# Altium PCB ResearchProject_V4_final.PcbDoc (part 2 of 2)
Units mm, origin at the board's own origin, x right, y up, seen from the top; angles counter-clockwise.
Board outline 152.49 x 130.17 mm, 4 copper layers (Top Layer, GND, 3V3, Bottom Layer), stack 0.603 mm thick; 141 components, 186 nets, 748 pads, 203 vias.
Unrouted connection lines stored in the file: 6.
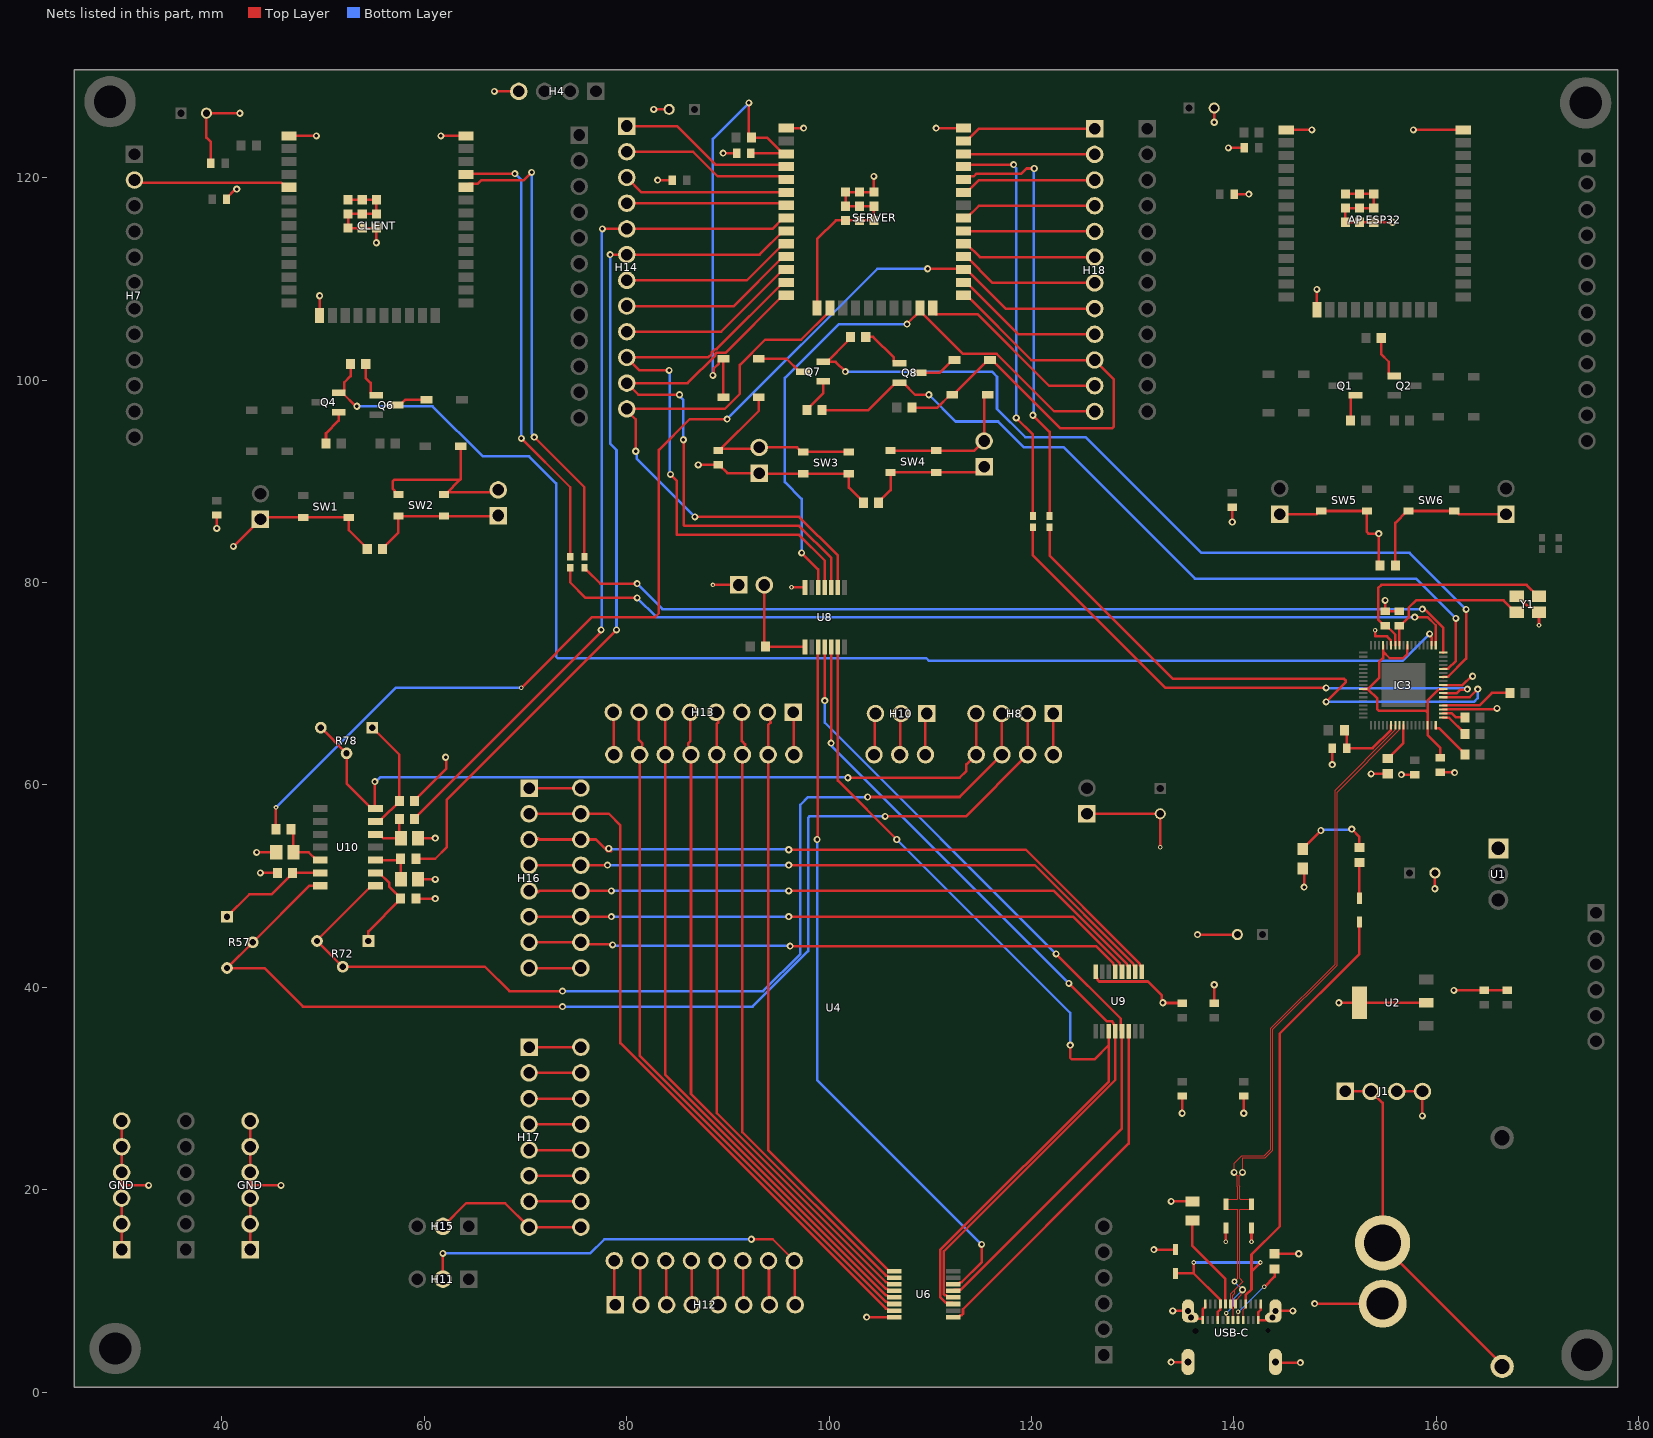
[diagram p4: the nets of this part, all layers, seen from the top]

## Via types
v1: diameter 0.7, hole 0.35, Top Layer to Bottom Layer, 188 vias
v2: diameter 0.45, hole 0.225, Top Layer to Bottom Layer, 14 vias
v3: diameter 0.6, hole 0.3, Top Layer to Bottom Layer, 1 vias

## Nets (pads, with @x,y where several pads share a name; then routed paths per layer and width w, separated by ;. In a path a pad name is that pad's centre, name@x,y a point inside that pad or via, vN(x,y) a via of type N, cw(c..) or ccw(c..) an arc to the next point about the centre after c; other vN are vias at no path point) (continued)
CLIENT_GPIO39: CLIENT.5 H7.2 | length 15.5
  Top Layer w0.25: H7.2@31.369,119.761 31.637,119.493 45.881,119.493 46.322,119.052 CLIENT.5@46.622,119.052
CLIENT_IO0_AUTO: D17.1 Q6.3 | length 3.2
  Top Layer w0.25: Q6.3@57.261,97.536 57.611,97.536 58.119,98.044 D17.1@60.226,98.044
CLIENT_IO0_KEY: D16.1 H20.2 SW2.3 SW2.4 | length 19.5
  Top Layer w0.25: SW2.4@57.44,88.705 57.29,88.705 57.065,88.93 57.065,89.08 56.896,89.249 56.896,90.024 57.042,90.17 63.555,90.17 63.599,90.214 ; D16.1@63.599,93.472 63.599,90.214 ; H20.2@67.31,89.154 67.085,88.929 62.165,88.929 SW2.3@61.94,88.705 62.09,88.705 63.599,90.214
CLIENT_RTS: IC3.19 Q4.2 R51.1 | length 134.3
  Top Layer w0.25: Q4.2@51.546,98.75 Q4.2@51.896,98.75 ; R51.1@52.717,101.6 52.717,100.398 52.096,99.777 52.096,98.95 Q4.2@51.896,98.75 ; v1(53.34,97.409) 53.237,97.409 Q4.2@51.896,98.75 ; v1(159.335,74.93) 159.335,74.808 159.537,74.606 IC3.19@159.537,73.813
  Bottom Layer w0.25: v1(53.34,97.409) 60.833,97.409 65.786,92.456 70.358,92.456 73.025,89.789 73.025,72.663 73.171,72.517 109.613,72.517 109.867,72.263 156.668,72.263 v1(159.335,74.93)
CLIENT_RXD: IC3.18 R19.1 | length 90.7
  Top Layer w0.25: R19.1@74.422,81.45 74.422,80.01 75.946,78.486 v1(81.026,78.486) ; v1(157.861,76.581) 159.131,76.581 159.937,75.775 IC3.18@159.937,73.813
  Bottom Layer w0.25: v1(81.026,78.486) 82.931,76.581 v1(157.861,76.581)
CLIENT_TXD: IC3.17 R18.1 | length 89.8
  Top Layer w0.25: R18.1@75.819,81.45 75.819,81.375 75.994,81.2 76.069,81.2 77.386,79.883 v1(81.026,79.883) ; v1(158.623,77.376) 158.709,77.29 158.919,77.29 160.687,75.522 IC3.17@160.687,73.063
  Bottom Layer w0.25: v1(81.026,79.883) 83.533,77.376 v1(158.623,77.376)
CLIENT_U0RXD: CLIENT.34 R18.2 | length 47.2
  Top Layer w0.25: CLIENT.34@64.122,119.052 64.447,119.377 65.275,119.377 65.659,119.761 69.85,119.761 v1(70.612,120.523) ; v1(70.866,94.361) 75.819,89.408 R18.2@75.819,82.55
  Bottom Layer w0.25: v1(70.612,120.523) 70.612,94.737 70.866,94.483 v1(70.866,94.361)
CLIENT_U0TXD: CLIENT.35 R19.2 | length 45
  Top Layer w0.25: CLIENT.35@64.122,120.322 64.196,120.396 v1(68.961,120.396) ; v1(69.596,94.234) 74.422,89.408 R19.2@74.422,82.55
  Bottom Layer w0.25: v1(68.961,120.396) 69.596,119.761 v1(69.596,94.234)
GND: "AP ESP32.1" "AP ESP32.15" "AP ESP32.38" "AP ESP32.39" "AP ESP32.40" "AP ESP32.41" "AP ESP32.42" "AP ESP32.43" "AP ESP32.44" "AP ESP32.45" "AP ESP32.46" "AP ESP32.47" C1.2 C2.2 C3.2 C4.2 C5.2 C6.2 C7.2 C8.2 C9.2 C10.2 C11.2 C12.1 C16.2 C17.2 C25.2 C32.2 C35.1 C37.2 C38.2 C39.2 C43.2 C45.1 C46.2 C49.2 C50.2 C51.2 C52.2 C59.2 C60.2 CLIENT.1 CLIENT.15 CLIENT.38 CLIENT.39 CLIENT.40 CLIENT.41 CLIENT.42 CLIENT.43 CLIENT.44 CLIENT.45 CLIENT.46 CLIENT.47 D8.1 D9.1 D10.1 D13.1 GND.1 GND.2 GND.3 GND.4 GND.5 GND.6 H4.4 H6.1 H19.1 H21.1 H22.1 IC3.3 IC3.9 IC3.29 J1.3 J1.4 J2.2 R5.2 R38.2 R50.2 R56.1 R65.2 R70.1 R77.1 R81.2 R88.2 SERVER.1 SERVER.15 SERVER.38 SERVER.39 SERVER.40 SERVER.41 SERVER.42 SERVER.43 SERVER.44 SERVER.45 SERVER.46 SERVER.47 SW1.1 SW1.2 SW3.1 SW3.2 SW5.1 SW5.2 U1.1 U2.2 U2.4 U4.1 U6.8 U8.7 U9.8 USB-C.1 USB-C.2 USB-C.3 USB-C.4 USB-C.A1 USB-C.A12 USB-C.B1 USB-C.B12 Y1.2 Y1.4 | length 303.4
  Top Layer w0.25: GND.1@30.099,14.097 GND.2@30.099,16.637 GND.3@30.099,19.177 30.099,20.435 ; GND.4@30.099,21.705 30.099,20.435 ; GND.4@30.099,21.717 GND.5@30.099,24.257 GND.6@30.099,26.797 ; v1(32.766,20.435) 30.099,20.435 ; C16.2@38.914,121.412 38.914,123.528 38.481,123.961 C8.2@38.481,126.365 v1(41.783,126.365) ; v1(39.497,85.344) C35.1@39.497,86.666 ; C9.2@40.461,117.856 40.461,117.961 41.372,118.872 v1(41.477,118.872) ; v1(41.148,83.566) H19.1@43.815,86.233 44.01,86.428 SW1.2@48.042,86.428 SW1.1@52.542,86.428 52.542,85.188 54.368,83.362 R50.2@54.368,83.312 ; GND.1@42.799,14.097 GND.2@42.799,16.637 GND.3@42.799,19.177 42.799,20.435 ; GND.4@42.799,21.705 42.799,20.435 ; GND.4@42.799,21.717 GND.5@42.799,24.257 GND.6@42.799,26.797 ; v1(43.434,53.34) C43.2@45.378,53.34 ; v1(43.815,51.308) R56.1@45.49,51.308 ; v1(45.847,20.435) 42.799,20.435 ; CLIENT.1@46.622,124.132 v1(49.35,124.132) ; CLIENT.15@49.657,106.372 v1(49.657,108.331) ; CLIENT.39@52.472,117.812 CLIENT.46@53.872,117.812 CLIENT.45@55.272,117.812 CLIENT.44@55.272,116.412 CLIENT.47@53.872,116.412 CLIENT.40@52.472,116.412 CLIENT.41@52.472,115.012 CLIENT.42@53.872,115.012 CLIENT.43@55.272,115.012 v1(55.272,113.565) ; R77.1@59.043,58.42 59.043,58.47 62.168,61.595 62.168,62.673 v1(62.103,62.738) ; R70.1@59.17,48.768 v1(61.087,48.768) ; C46.2@59.397,50.673 v1(61.087,50.673) ; C49.2@59.397,54.737 v1(61.087,54.737) ; v1(61.648,124.132) CLIENT.38@64.122,124.132 ; v1(66.929,128.524) H4.4@69.342,128.524 ; v1(82.677,126.746) C50.2@84.201,126.746 ; v1(83.058,119.761) C51.2@84.507,119.761 ; v1(87.07,91.619) C45.1@89.027,91.619 ; v2(88.519,79.756) H21.1@91.059,79.756 ; C45.1@89.132,91.619 89.946,90.805 H22.1@93.091,90.805 93.15,90.746 SW3.2@97.445,90.746 SW3.1@101.945,90.746 101.945,89.379 103.39,87.934 R65.2@103.39,87.884 ; v1(89.535,122.428) C52.2@90.857,122.428 ; SERVER.1@95.771,124.894 v1(97.483,124.894) ; v2(96.283,79.519) U8.7@97.618,79.519 ; SERVER.15@98.806,107.134 98.806,113.919 100.661,115.774 SERVER.41@101.621,115.774 SERVER.42@103.021,115.774 SERVER.43@104.421,115.774 SERVER.44@104.421,117.174 SERVER.47@103.021,117.174 SERVER.40@101.621,117.174 SERVER.39@101.621,118.574 SERVER.46@103.021,118.574 SERVER.45@104.421,118.574 v1(104.421,120.115) ; v1(103.707,7.418) U6.8@106.426,7.418 ; v1(110.564,124.894) SERVER.38@113.271,124.894 ; U4.1@125.476,57.149 C17.2@132.715,57.15 v2(132.715,53.848) ; U9.8@126.335,41.529 126.335,41.029 126.533,40.831 126.533,40.71 126.666,40.577 131.508,40.577 132.883,39.202 132.883,38.567 v1(132.969,38.481) 132.995,38.455 134.848,38.455 C32.2@134.874,38.429 ; v1(132.08,14.097) D10.1@134.239,14.097 ; v1(133.792,18.857) R88.2@135.89,18.857 ; v1(133.798,2.981) USB-C.3@135.463,2.981 ; v1(133.955,8.031) USB-C.1@135.463,8.031 ; v1(134.874,27.559) C7.2@134.874,29.262 ; USB-C.1@135.763,7.381 135.888,7.256 136.898,7.256 136.908,7.246 USB-C.B12@136.908,7.131 136.908,8.166 137.158,8.416 USB-C.A1@137.158,8.731 ; v1(136.398,45.212) C3.2@140.335,45.212 ; C37.2@138.049,38.429 v1(138.049,40.259) ; v1(138.049,125.476) C1.2@138.049,126.873 ; v2(139.192,14.859) D9.1@139.192,16.224 ; v1(139.446,122.936) C10.2@141.022,122.936 ; v1(139.827,85.979) C12.1@139.827,87.428 ; C11.2@140.029,118.364 v1(141.478,118.364) ; v1(140.97,27.559) C5.2@140.97,29.262 ; v2(141.732,14.859) D8.1@141.732,16.224 ; USB-C.A12@142.658,8.731 142.648,8.721 142.648,8.146 142.408,7.906 USB-C.B1@142.408,7.131 143.496,7.131 144.103,7.738 USB-C.2@144.103,8.031 v1(145.826,8.031) ; R81.2@144.018,13.685 v1(146.4,13.685) ; USB-C.4@144.103,2.981 144.163,2.921 v1(146.558,2.921) ; H6.1@144.526,86.741 148.154,86.741 148.476,87.063 SW5.2@148.626,87.063 SW5.1@153.126,87.063 153.126,84.999 153.289,84.836 v1(154.305,84.836) 154.305,81.8 R5.2@154.444,81.661 ; 145.161,124.714 v1(147.701,124.714) ; D13.1@146.812,51.755 146.939,51.628 v1(146.939,49.911) ; v1(147.968,8.75) J2.2@154.686,8.75 ; 148.196,106.954 v1(148.196,108.953) ; v1(149.71,61.999) C25.2@149.71,63.627 ; v1(150.368,38.481) U2.4@152.402,38.481 U2.2@159.002,38.481 ; 151.011,118.394 152.411,118.394 153.811,118.394 153.811,116.994 152.411,116.994 151.011,116.994 151.011,115.594 152.411,115.594 153.811,115.594 v1(155.678,115.594) ; v1(153.555,61.099) R38.2@155.194,61.099 ; v2(153.943,75.292) 153.943,74.676 155.119,74.676 155.512,74.283 155.512,73.838 IC3.29@155.537,73.813 ; v1@154.854,78.146 v1(154.94,78.232) C60.2@154.94,77.164 C59.2@156.337,77.164 ; J1.3@156.083,29.718 J1.4@158.623,29.718 v1(158.623,27.305) ; v1(156.539,61.012) C39.2@157.861,61.012 ; v1(157.734,124.714) 162.661,124.714 ; v1(159.853,49.744) C2.2@159.853,51.308 ; C38.2@160.401,61.266 160.427,61.24 161.772,61.24 v1(161.798,61.214) ; IC3.3@160.687,67.463 160.712,67.488 165.913,67.488 v1(165.989,67.564) ; IC3.9@160.687,69.863 162.573,69.863 163.449,70.739 v1(163.576,70.739) ; v1(161.723,39.699) C4.2@164.719,39.699 C6.2@167.005,39.699 ; Y1.4@167.937,78.651 168.062,78.651 169.212,77.501 169.687,77.501 Y1.2@170.137,77.051 v2(170.137,75.776)
NetC25_1: C25.1 FB2.2 IC3.57 | length 7.5
  Top Layer w0.25: FB2.2@150.914,65.405 151.13,65.189 C25.1@151.13,63.627 153.696,63.627 155.512,65.443 155.512,65.888 IC3.57@155.537,65.913
NetC43_1: C43.1 R54.2 U10.5 | length 5.3
  Top Layer w0.25: R54.2@46.851,55.626 47.078,55.399 C43.1@47.078,53.34 48.589,53.34 49.351,52.578 U10.5@49.732,52.578
NetC46_1: C46.1 R68.2 U10.10 | length 4.6
  Top Layer w0.25: U10.10@55.17,52.578 57.543,52.578 R68.2@57.67,52.705 57.697,52.678 C46.1@57.697,50.673
NetC49_1: C49.1 R75.2 U10.12 | length 4.7
  Top Layer w0.25: U10.12@55.17,55.118 55.551,55.118 55.932,54.737 C49.1@57.697,54.737 57.543,54.891 R75.2@57.543,56.642
NetC59_1: C59.1 IC3.27 Y1.1 | length 15.6
  Top Layer w0.25: IC3.27@156.337,73.813 C59.1@156.337,75.744 156.442,75.744 157.259,76.561 157.259,77.503 157.988,78.232 166.631,78.232 167.812,77.051 Y1.1@167.937,77.051
NetC60_1: C60.1 IC3.28 Y1.3 | length 22.8
  Top Layer w0.25: C60.1@154.94,75.744 154.835,75.744 154.243,76.336 154.243,79.44 154.559,79.756 168.907,79.756 170.012,78.651 Y1.3@170.137,78.651 ; C60.1@155.045,75.744 155.937,74.852 IC3.28@155.937,73.813
NetCN1_A4: D6.2 D10.2 USB-C.A4 USB-C.A9 USB-C.B4 USB-C.B9 | length 60.6
  Top Layer w0.1: USB-C.B4@140.908,7.131 140.908,8.166 141.158,8.416 USB-C.A9@141.158,8.731
  Top Layer w0.25: D10.2@134.239,11.747 136.028,11.747 ; v2(136.028,12.816) 136.028,11.747 ; USB-C.B9@138.408,7.131 138.408,7.951 138.648,8.191 138.648,8.721 USB-C.A4@138.658,8.731 138.648,8.741 138.648,9.127 136.028,11.747 ; USB-C.A9@141.158,8.731 141.158,9.591 141.732,10.165 141.732,11.877 ; v2(142.61,12.816) 141.732,11.938 141.732,11.877 ; D6.2@152.4,46.45 152.4,43.307 144.526,35.433 144.526,16.383 141.732,13.589 141.732,11.877
  Bottom Layer w0.25: v2(136.028,12.816) v2(142.61,12.816)
NetCN1_A5: R88.1 USB-C.A5 | length 9.6
  Top Layer w0.25: R88.1@135.89,16.957 135.89,14.448 139.158,11.18 USB-C.A5@139.158,8.731
NetCN1_B5: R81.1 USB-C.B5 | length 6.6
  Top Layer w0.1: USB-C.B5@140.408,7.131 v2(140.408,7.947)
  Top Layer w0.25: v2(143.002,10.414) 144.018,11.43 R81.1@144.018,12.184
  Bottom Layer w0.1: v2(140.408,7.947) 140.472,7.947 142.939,10.414 v2(143.002,10.414)
NetD13_2: D13.2 R44.1 | length 7.8
  Top Layer w0.25: D13.2@146.812,53.655 146.812,53.73 148.581,55.499 v1(148.59,55.499) ; v1(151.638,55.626) 152.4,54.864 R44.1@152.4,53.824
  Bottom Layer w0.25: v1(148.59,55.499) 148.653,55.562 151.575,55.562 v1(151.638,55.626)
NetF1_1: F1.1 J1.1 J1.2 J2.1 | length 35.1
  Top Layer w0.25: J1.1@151.003,29.718 J1.2@153.543,29.718 154.686,28.575 J2.1@154.686,14.75 154.686,14.554 166.497,2.743 F1.1@166.497,2.546
NetH20_1: H20.1 R50.1 SW2.1 SW2.2 | length 13.8
  Top Layer w0.25: R50.1@55.868,83.312 55.868,83.362 57.44,84.934 SW2.2@57.44,86.555 SW2.1@61.94,86.555 67.251,86.555 H20.1@67.31,86.614
NetH21_2: H21.2 R48.1 U8.8 | length 10.1
  Top Layer w0.25: H21.2@93.599,79.756 93.599,73.775 R48.1@93.714,73.66 97.601,73.66 U8.8@97.618,73.643
NetH23_1: H23.1 R65.1 SW4.1 SW4.2 | length 13
  Top Layer w0.25: R65.1@104.89,87.884 104.89,87.934 106.081,89.125 SW4.2@106.081,90.873 SW4.1@110.581,90.873 114.749,90.873 H23.1@115.316,91.44
NetH24_1: H24.1 R5.1 SW6.1 SW6.2 | length 15.8
  Top Layer w0.25: R5.1@155.944,81.661 155.944,85.895 157.112,87.063 SW6.2@157.262,87.063 SW6.1@161.762,87.063 161.912,87.063 162.234,86.741 H24.1@166.878,86.741
NetIC3_1: IC3.1 R42.2 | length 2.8
  Top Layer w0.25: IC3.1@160.687,66.663 160.712,66.638 161.262,66.638 162.826,65.074 R42.2@162.826,65.024
NetIC3_2: IC3.2 R40.2 | length 2.3
  Top Layer w0.25: IC3.2@160.687,67.063 161.537,67.063 161.925,66.675 R40.2@162.826,66.675
NetIC3_4: IC3.4 R33.1 | length 7.1
  Top Layer w0.25: IC3.4@160.687,67.863 164.256,67.863 165.481,69.088 R33.1@167.271,69.088
NetIC3_60: IC3.60 R38.1 | length 4
  Top Layer w0.25: R38.1@155.194,62.599 155.244,62.599 155.569,62.924 155.569,62.974 156.737,64.142 IC3.60@156.737,65.913
NetIC3_68: IC3.68 R45.1 | length 4.3
  Top Layer w0.25: IC3.68@159.937,65.913 159.937,65.638 159.962,65.613 160.255,65.613 162.826,63.042 R45.1@162.826,62.992
NetQ1_1: Q1.1 R2.2 | length 2.8
  Top Layer w0.25: R2.2@151.523,96.012 151.523,98.281 151.723,98.481 Q1.1@152.003,98.481
NetQ2_1: Q2.1 R3.2 | length 4.5
  Top Layer w0.25: R3.2@154.547,104.14 154.547,102.557 155.295,101.809 155.295,100.601 155.495,100.401 Q2.1@155.845,100.401
NetQ4_1: Q4.1 R47.2 | length 3.6
  Top Layer w0.25: R47.2@50.304,93.726 50.292,93.738 50.292,94.742 51.546,95.996 Q4.1@51.546,96.83
NetQ6_1: Q6.1 R51.2 | length 3.7
  Top Layer w0.25: R51.2@54.217,101.6 54.217,100.208 54.711,99.714 54.711,98.696 54.911,98.496 Q6.1@55.261,98.496
NetQ7_1: Q7.1 R59.2 | length 3.5
  Top Layer w0.25: R59.2@97.802,97.028 97.802,97.078 99.425,98.701 Q7.1@99.425,99.878
NetQ8_1: Q8.1 R69.2 | length 4.6
  Top Layer w0.25: R69.2@103.62,104.267 104.354,104.267 106.4,102.221 106.4,101.871 106.6,101.671 Q8.1@106.95,101.671
NetR56_2: R56.2 R57.1 U10.6 | length 11
  Top Layer w0.25: R57.1@40.513,46.99 42.711,49.188 44.92,49.188 46.99,51.258 R56.2@46.99,51.308 U10.6@49.732,51.308
NetR70_2: R70.2 R72.1 U10.9 | length 9.3
  Top Layer w0.25: R72.1@54.483,44.577 54.483,45.531 57.67,48.718 57.67,48.818 56.561,49.927 56.561,50.298 55.551,51.308 U10.9@55.17,51.308
NetR77_2: R77.2 R78.1 U10.13 | length 11.6
  Top Layer w0.25: R78.1@54.864,65.659 57.543,62.98 57.543,58.37 55.786,56.613 55.395,56.613 U10.13@55.17,56.388
NetU6_9: U6.9 U9.14 | length 35.8
  Top Layer w0.25: U6.9@112.276,7.418 112.776,7.418 112.974,7.616 113.095,7.616 113.228,7.749 113.228,8.199 129.585,24.556 U9.14@129.585,35.679
PLC_A_1: H8.2 R57.2 R57.3 U4.4 U10.7 | length 115.4
  Top Layer w0.25: U10.7@49.732,50.038 49.717,50.023 48.626,50.023 R57.2@43.053,44.45 R57.3@40.513,41.91 44.196,41.91 48.006,38.1 v1(73.66,38.1) ; v1(105.537,56.896) 113.523,56.896 U4.4@119.616,62.989 119.603,63.002 119.603,67.042 H8.2@119.59,67.055
  Bottom Layer w0.25: v1(73.66,38.1) 92.445,38.1 97.917,43.572 97.917,56.75 98.063,56.896 v1(105.537,56.896)
PLC_A_2: H8.3 R72.2 R72.3 U4.5 U10.8 | length 100.2
  Top Layer w0.25: U10.8@55.17,50.038 54.789,50.038 49.403,44.652 R72.3@49.403,44.577 R72.2@51.943,42.037 65.999,42.037 68.412,39.624 v1(73.66,39.624) ; v1(103.796,58.808) 112.894,58.808 U4.5@117.076,62.989 117.063,63.002 117.063,67.042 H8.3@117.05,67.055
  Bottom Layer w0.25: v1(73.66,39.624) 93.472,39.624 97.155,43.307 97.155,58.039 97.917,58.801 103.789,58.801 v1(103.796,58.808)
PLC_A_3: H8.4 R78.2 R78.3 U4.6 U10.14 | length 78.2
  Top Layer w0.25: R78.3@49.784,65.659 R78.2@52.324,63.119 52.324,60.123 54.789,57.658 U10.14@55.17,57.658 55.118,57.71 v1(55.118,60.325) ; v1(101.854,60.706) 112.884,60.706 113.569,61.391 113.569,62.022 U4.6@114.536,62.989 114.523,63.002 114.523,67.042 H8.4@114.51,67.055
  Bottom Layer w0.25: v1(55.118,60.325) 55.236,60.325 55.69,60.778 101.782,60.778 v1(101.854,60.706)
PLC_A_GND: H8.1 U4.3 | length 4.1
  Top Layer w0.25: H8.1@122.13,67.055 122.156,67.029 U4.3@122.156,62.989
PLC_A_RS_GND: H10.3 U4.9 | length 4.1
  Top Layer w0.25: U4.9@104.436,62.989 104.508,63.062 104.508,66.983 H10.3@104.581,67.055
PLC_A_RS_RX: H10.1 U4.7 | length 4.1
  Top Layer w0.25: U4.7@109.516,62.989 109.516,66.91 H10.1@109.661,67.055
PLC_A_RS_TX: H10.2 U4.8 | length 4.1
  Top Layer w0.25: U4.8@106.976,62.989 107.048,63.062 107.048,66.983 H10.2@107.121,67.055
PLC_B_1: H13.2 U4.11 U6.1 | length 60.9
  Top Layer w0.25: H13.2@93.913,67.182 94.195,66.9 94.195,66.206 94.234,66.167 93.976,65.909 U4.11@93.976,62.989 93.976,23.918 105.926,11.968 U6.1@106.426,11.968
PLC_B_2: H13.3 U4.12 U6.2 | length 61.7
  Top Layer w0.25: H13.3@91.373,67.182 91.373,64.329 91.694,64.008 91.694,63.881 ; U4.12@91.436,62.989 91.436,25.688 105.607,11.516 105.728,11.516 105.926,11.318 U6.2@106.426,11.318
PLC_B_3: H13.4 U4.13 U6.3 | length 64.3
  Top Layer w0.25: H13.4@88.833,67.182 89.027,66.988 89.027,66.167 88.896,66.036 U4.13@88.896,62.989 88.896,27.578 105.607,10.866 105.728,10.866 105.926,10.668 U6.3@106.426,10.668
PLC_B_4: H13.5 U4.14 U6.4 | length 65
  Top Layer w0.25: 86.106,63.881 86.106,64.135 86.293,64.322 H13.5@86.293,67.182 ; U4.14@86.356,62.989 86.356,29.468 105.607,10.216 105.728,10.216 105.926,10.018 U6.4@106.426,10.018
PLC_B_5: H13.6 U4.15 U6.5 | length 67.6
  Top Layer w0.25: H13.6@83.753,67.182 83.816,67.119 83.816,66.29 ; 83.82,66.294 83.816,66.29 ; U6.5@106.426,9.368 105.926,9.368 105.728,9.566 105.607,9.566 83.816,31.358 U4.15@83.816,62.989 83.816,66.29
PLC_B_6: H13.7 U4.16 U6.6 | length 68.5
  Top Layer w0.25: H13.7@81.213,67.182 81.213,64.456 81.557,64.112 81.557,63.904 81.534,63.881 ; U4.16@81.276,62.989 81.276,33.248 105.607,8.916 105.728,8.916 105.926,8.718 U6.6@106.426,8.718
PLC_B_GND: H13.1 U4.10 | length 4.2
  Top Layer w0.25: H13.1@96.453,67.182 96.516,67.119 U4.10@96.516,62.989
PLC_B_VI: H13.8 U4.17 | length 4.2
  Top Layer w0.25: H13.8@78.673,67.182 78.704,67.151 78.704,63.021 U4.17@78.736,62.989
PLC_C_1: H16.2 U4.19 U6.7 | length 69
  Top Layer w0.25: H16.2@70.358,57.149 71.501,57.15 U4.19@75.476,57.149 78.233,57.149 79.375,56.007 79.375,34.499 105.607,8.266 105.728,8.266 105.926,8.068 U6.7@106.426,8.068
PLC_C_2: H16.3 U4.20 U9.1 | length 65.8
  Top Layer w0.25: 71.247,54.737 71.375,54.609 U4.20@75.476,54.609 76.963,54.609 78.105,53.467 78.486,53.467 ; v1(96.012,53.594) 119.44,53.594 130.687,42.348 130.687,42.227 130.885,42.029 U9.1@130.885,41.529
  Bottom Layer w0.25: v1(78.232,53.721) 78.295,53.657 95.948,53.657 v1(96.012,53.594)
PLC_C_3: H16.4 U4.21 U9.2 | length 64.6
  Top Layer w0.25: H16.4@70.358,52.069 76.454,52.069 v1(78.105,52.07) ; v1(96.012,52.07) 120.314,52.07 130.037,42.348 130.037,42.227 130.235,42.029 U9.2@130.235,41.529
  Bottom Layer w0.25: v1(78.105,52.07) v1(96.012,52.07)
PLC_C_4: H16.5 U4.22 U9.3 | length 62.1
  Top Layer w0.25: 71.247,49.403 71.373,49.529 U4.22@75.476,49.529 v1(78.486,49.53) ; v1(96.012,49.53) 122.204,49.53 129.387,42.348 129.387,42.227 129.585,42.029 U9.3@129.585,41.529
  Bottom Layer w0.25: v1(78.486,49.53) v1(96.012,49.53)
PLC_C_5: H16.6 U4.23 U9.4 | length 61.2
  Top Layer w0.25: H16.6@70.358,46.989 U4.23@75.476,46.989 v1(78.486,46.99) ; v1(96.012,46.99) 124.094,46.99 128.737,42.348 128.737,42.227 128.935,42.029 U9.4@128.935,41.529
  Bottom Layer w0.25: v1(78.486,46.99) v1(96.012,46.99)
PLC_C_6: H16.7 U4.24 U9.5 | length 59.5
  Top Layer w0.25: H16.7@70.358,44.449 71.628,44.45 U4.24@75.476,44.449 75.643,44.282 78.527,44.282 v1(78.613,44.196) ; v1(96.139,44.069) 126.365,44.069 128.087,42.348 128.087,42.227 128.285,42.029 U9.5@128.285,41.529
  Bottom Layer w0.25: v1(78.613,44.196) 78.676,44.133 96.075,44.133 v1(96.139,44.069)
PLC_C_GND: H16.1 U4.18 | length 5.1
  Top Layer w0.25: H16.1@70.358,59.689 U4.18@75.476,59.689
PLC_C_VI2: H16.8 U4.25 | length 5.1
  Top Layer w0.25: H16.8@70.358,41.909 U4.25@75.476,41.909
PLC_D_1: H17.2 U4.27 | length 5.1
  Top Layer w0.25: H17.2@70.358,31.549 U4.27@75.476,31.549
PLC_D_2: H17.3 U4.28 | length 5.1
  Top Layer w0.25: H17.3@70.358,29.009 U4.28@75.476,29.009
PLC_D_3: H17.4 U4.29 | length 5.1
  Top Layer w0.25: H17.4@70.358,26.469 U4.29@75.476,26.469
PLC_D_4: H17.5 U4.30 | length 5.1
  Top Layer w0.25: H17.5@70.358,23.929 U4.30@75.476,23.929
PLC_D_5: H17.6 U4.31 | length 5.1
  Top Layer w0.25: H17.6@70.358,21.389 U4.31@75.476,21.389
PLC_D_6: H17.7 U4.32 | length 5.1
  Top Layer w0.25: H17.7@70.358,18.849 U4.32@75.476,18.849
PLC_D_GND: H17.1 U4.26 | length 5.1
  Top Layer w0.25: H17.1@70.358,34.089 U4.26@75.476,34.089
PLC_D_VO1: H15.2 H17.8 U4.33 | length 15.6
  Top Layer w0.25: H15.2@61.849,16.383 64.135,18.669 67.998,18.669 H17.8@70.358,16.309 U4.33@75.476,16.309
PLC_DS: U6.14 U8.10 | length 71.3
  Top Layer w0.25: v1(98.806,54.61) 98.862,54.666 98.862,73.587 U8.10@98.918,73.643 ; U6.14@112.276,10.668 112.776,10.668 112.974,10.866 113.095,10.866 115.062,12.834 v1(115.062,14.605)
  Bottom Layer w0.25: v1(98.806,54.61) 98.806,30.861 v1(115.062,14.605)
PLC_E_1: H12.2 U4.35 | length 4.4
  Top Layer w0.25: U4.35@81.316,12.989 81.362,12.944 81.362,8.681 H12.2@81.407,8.636
PLC_E_2: H12.3 U4.36 | length 4.4
  Top Layer w0.25: U4.36@83.856,12.989 83.902,12.944 83.902,8.681 H12.3@83.947,8.636
PLC_E_3: H12.4 U4.37 | length 4.4
  Top Layer w0.25: U4.37@86.396,12.989 86.442,12.944 86.442,8.681 H12.4@86.487,8.636
PLC_E_4: H12.5 U4.38 | length 4.4
  Top Layer w0.25: U4.38@88.936,12.989 88.982,12.944 88.982,8.681 H12.5@89.027,8.636
PLC_E_5: H12.6 U4.39 | length 4.4
  Top Layer w0.25: U4.39@91.476,12.989 91.522,12.944 91.522,8.681 H12.6@91.567,8.636
PLC_E_6: H12.7 U4.40 | length 4.4
  Top Layer w0.25: U4.40@94.016,12.989 94.062,12.944 94.062,8.681 H12.7@94.107,8.636
PLC_E_GND: H12.1 U4.34 | length 4.4
  Top Layer w0.25: U4.34@78.776,12.989 78.776,8.727 H12.1@78.867,8.636
PLC_E_VO2: H11.2 H12.8 U4.41 | length 43.1
  Top Layer w0.25: H11.2@61.849,11.176 v1(61.849,13.716) ; v1(92.329,15.113) 94.432,15.113 U4.41@96.556,12.989 96.602,12.944 96.602,8.681 H12.8@96.647,8.636
  Bottom Layer w0.25: v1(61.849,13.716) 76.391,13.716 77.787,15.113 v1(92.329,15.113)
PLC_OE: U6.13 U8.11 U9.13 | length 83.1
  Top Layer w0.25: v1(99.568,68.326) U8.11@99.568,73.643 ; U6.13@112.276,10.018 112.376,10.118 112.996,10.118 128.935,26.057 U9.13@128.935,35.679 128.835,35.779 128.835,36.9 v1(122.428,43.307)
  Bottom Layer w0.25: v1(99.568,68.326) 99.568,66.167 v1(122.428,43.307)
PLC_SH_CP: U6.11 U8.13 U9.11 | length 89.1
  Top Layer w0.25: U8.13@100.868,73.643 100.868,60.422 v1(106.68,54.61) ; U6.11@112.276,8.718 112.176,8.818 111.556,8.818 110.973,9.401 110.973,14.054 127.635,30.717 127.635,34.328 ; v1(123.825,34.29) 123.825,33.039 123.971,32.893 126.2,32.893 127.635,34.328 ; U9.11@127.635,35.429 127.635,34.328
  Bottom Layer w0.25: v1(106.68,54.61) 123.825,37.465 v1(123.825,34.29)
PLC_ST_CP: U6.12 U8.12 U9.12 | length 84
  Top Layer w0.25: v1(100.203,64.135) 100.211,64.143 100.211,73.635 U8.12@100.218,73.643 ; U6.12@112.276,9.368 111.776,9.368 111.578,9.566 111.457,9.566 111.324,9.699 111.324,13.909 128.285,30.869 U9.12@128.285,35.679 128.285,36.179 128.087,36.377 128.087,36.498 127.954,36.631 127.453,36.631 v1(123.698,40.386)
  Bottom Layer w0.25: v1(100.203,64.135) 100.289,64.049 100.289,63.795 v1(123.698,40.386)
SERVER_DTR: IC3.13 Q8.2 R59.1 | length 79.2
  Top Layer w0.25: R59.1@99.302,97.028 103.877,97.028 106.6,99.751 Q8.2@106.95,99.751 107.3,99.751 108.499,98.552 v1(109.855,98.552) ; IC3.13@160.687,71.463 160.712,71.488 161.157,71.488 161.925,72.256 v1(161.925,76.454)
  Bottom Layer w0.25: v1(109.855,98.552) 112.502,95.905 116.693,95.905 119.253,93.345 123.19,93.345 136.144,80.391 157.988,80.391 v1(161.925,76.454)
SERVER_EN: C52.1 D18.2 D19.2 R102.2 SERVER.3 | length 45.1
  Top Layer w0.25: v1(88.519,100.457) 88.605,100.543 88.605,101.15 89.113,101.658 89.113,101.858 89.363,102.108 D19.2@89.563,102.108 D18.2@89.563,98.298 ; v1(92.075,127.381) 92.075,124.194 R102.2@92.317,123.952 93.873,123.952 SERVER.3@95.397,122.428 ; C52.1@92.277,122.428 SERVER.3@95.397,122.428 ; SERVER.3@95.697,122.428 SERVER.3@95.397,122.428
  Bottom Layer w0.25: v1(88.519,100.457) 88.519,123.825 v1(92.075,127.381)
SERVER_EN_AUTO: D19.1 Q7.3 | length 4.9
  Top Layer w0.25: D19.1@93.063,102.108 95.805,102.108 97.075,100.838 Q7.3@97.425,100.838
SERVER_EN_KEY: C45.2 D18.1 H22.2 SW3.3 SW3.4 | length 20.1
  Top Layer w0.25: C45.2@89.027,93.039 89.18,93.192 92.938,93.192 H22.2@93.091,93.345 96.846,93.345 97.295,92.896 SW3.4@97.445,92.896 SW3.3@101.945,92.896 ; C45.2@89.132,93.039 93.063,96.97 D18.1@93.063,98.298
SERVER_GPIO0: D20.2 D21.2 H18.10 R64.1 SERVER.25 | length 47.8
  Top Layer w0.25: R64.1@108.18,97.282 110.699,97.282 111.969,98.552 112.369,98.552 112.619,98.802 112.619,98.905 115.695,101.981 D21.2@115.895,101.981 116.095,101.981 122.826,95.25 127.997,95.25 128.143,95.396 128.143,100.076 H18.10@126.238,101.981 119.974,101.981 113.571,108.384 SERVER.25@113.271,108.384
SERVER_GPIO2: H18.11 SERVER.24 | length 19.4
  Top Layer w0.25: SERVER.24@110.236,107.134 110.236,106.834 110.561,106.509 114.666,106.509 121.734,99.441 H18.11@126.238,99.441
SERVER_GPIO4: H18.9 SERVER.26 | length 15.1
  Top Layer w0.25: SERVER.26@113.271,109.654 113.571,109.654 118.704,104.521 H18.9@126.238,104.521
SERVER_GPIO5: H18.6 SERVER.29 | length 13.5
  Top Layer w0.25: SERVER.29@113.271,113.464 113.571,113.464 114.894,112.141 H18.6@126.238,112.141
SERVER_GPIO12: H14.11 SERVER.14 U8.3 | length 57
  Top Layer w0.25: v1(85.217,98.552) 81.153,98.552 H14.11@80.01,99.695 86.009,99.695 88.761,102.447 88.761,102.577 88.894,102.71 89.797,102.71 95.471,108.384 SERVER.14@95.771,108.384 ; v1(85.598,94.107) 85.661,94.043 85.661,85.661 85.725,85.598 97.028,85.598 100.218,82.408 U8.3@100.218,79.519
  Bottom Layer w0.25: v1(85.217,98.552) 85.217,98.43 85.598,98.049 v1(85.598,94.107)
SERVER_GPIO13: H14.12 SERVER.16 U8.2 | length 58.3
  Top Layer w0.25: v1(80.899,92.964) 80.899,96.122 80.01,97.011 H14.12@80.01,97.155 89.69,97.155 91.183,98.648 91.183,101.499 93.688,104.004 97.246,104.004 100.076,106.834 SERVER.16@100.076,107.134 ; v1(86.741,86.487) 97.028,86.487 100.868,82.647 U8.2@100.868,79.519
  Bottom Layer w0.25: v1(80.899,92.964) 80.985,92.878 80.985,92.243 v1(86.741,86.487)
SERVER_GPIO14: H14.10 SERVER.13 U8.4 | length 58.5
  Top Layer w0.25: v1(84.201,100.965) 81.28,100.965 H14.10@80.01,102.235 88.052,102.235 88.41,102.593 88.41,102.722 88.749,103.061 88.878,103.061 95.471,109.654 SERVER.13@95.771,109.654 ; v1(84.328,90.678) 84.963,90.043 84.963,84.709 97.028,84.709 99.568,82.169 U8.4@99.568,79.519
  Bottom Layer w0.25: v1(84.201,100.965) 84.264,100.901 84.264,90.742 v1(84.328,90.678)
SERVER_GPIO15: H18.12 SERVER.23 U8.5 | length 59.8
  Top Layer w0.25: v1(97.282,82.931) 98.918,81.295 U8.5@98.918,79.519 ; v1(107.696,105.537) 107.696,105.564 SERVER.23@108.966,106.834 ; SERVER.23@108.966,107.134 SERVER.23@108.966,106.834 ; H18.12@126.238,96.901 122.245,96.901 116.564,102.583 113.217,102.583 SERVER.23@108.966,106.834
  Bottom Layer w0.25: v1(97.282,82.931) 97.282,88.265 95.631,89.916 95.631,100.203 100.965,105.537 v1(107.696,105.537)
SERVER_GPIO16: H18.8 R54.1 SERVER.27 | length 116.2
  Top Layer w0.25: R54.1@45.351,55.626 v2(45.351,57.773) ; v2(69.596,69.596) 76.581,76.581 82.804,76.581 83.185,76.962 83.185,93.091 86.233,96.139 v1(89.916,96.139) ; v1(109.728,110.998) 113.197,110.998 SERVER.27@113.271,110.924 113.571,110.924 117.434,107.061 H18.8@126.238,107.061
  Bottom Layer w0.25: v2(45.351,57.773) 57.174,69.596 v2(69.596,69.596) ; v1(89.916,96.139) 104.775,110.998 v1(109.728,110.998)
SERVER_GPIO17: H18.7 SERVER.28 | length 14
  Top Layer w0.25: SERVER.28@113.271,112.194 113.571,112.194 116.164,109.601 H18.7@126.238,109.601
SERVER_GPIO18: H18.5 SERVER.30 | length 13
  Top Layer w0.25: SERVER.30@113.271,114.734 113.324,114.681 H18.5@126.238,114.681
SERVER_GPIO19: H18.4 SERVER.31 | length 13.5
  Top Layer w0.25: SERVER.31@113.271,116.004 113.571,116.004 114.788,117.221 H18.4@126.238,117.221
SERVER_GPIO21: H18.3 SERVER.33 | length 13.5
  Top Layer w0.25: SERVER.33@113.271,118.544 113.571,118.544 114.788,119.761 H18.3@126.238,119.761
SERVER_GPIO22: H18.2 SERVER.36 | length 13
  Top Layer w0.25: SERVER.36@113.271,122.354 113.324,122.301 H18.2@126.238,122.301
SERVER_GPIO23: H18.1 SERVER.37 | length 13.5
  Top Layer w0.25: SERVER.37@113.271,123.624 113.571,123.624 114.788,124.841 H18.1@126.238,124.841
SERVER_GPIO25: H14.7 SERVER.10 | length 17.3
  Top Layer w0.25: H14.7@80.01,109.855 91.862,109.855 95.471,113.464 SERVER.10@95.771,113.464
SERVER_GPIO26: H14.8 SERVER.11 | length 17.8
  Top Layer w0.25: H14.8@80.01,107.315 90.592,107.315 95.471,112.194 SERVER.11@95.771,112.194
SERVER_GPIO27: H14.9 SERVER.12 | length 18.3
  Top Layer w0.25: H14.9@80.01,104.775 89.322,104.775 95.471,110.924 SERVER.12@95.771,110.924
SERVER_GPIO32: H14.5 R75.1 SERVER.8 | length 84.6
  Top Layer w0.25: R75.1@59.043,56.642 59.043,56.692 77.47,75.119 v1(77.47,75.311) ; v1(77.597,114.935) H14.5@80.01,114.935 94.402,114.935 95.471,116.004 SERVER.8@95.771,116.004
  Bottom Layer w0.25: v1(77.47,75.311) 77.534,75.374 77.534,114.871 v1(77.597,114.935)
SERVER_GPIO33: H14.6 R68.1 SERVER.9 | length 87.7
  Top Layer w0.25: R68.1@59.17,52.705 61.087,52.705 62.23,53.848 62.23,58.547 v1(78.994,75.311) ; v1(78.359,112.395) H14.6@80.01,112.395 93.132,112.395 95.471,114.734 SERVER.9@95.771,114.734
  Bottom Layer w0.25: v1(78.359,112.395) 78.359,93.726 78.994,93.091 v1(78.994,75.311)
SERVER_GPIO34: H14.3 SERVER.6 | length 16.4
  Top Layer w0.25: H14.3@80.01,120.015 81.481,118.544 SERVER.6@95.771,118.544
SERVER_GPIO35: H14.4 SERVER.7 | length 15.8
  Top Layer w0.25: H14.4@80.01,117.475 95.57,117.475 SERVER.7@95.771,117.274
SERVER_GPIO36: H14.1 SERVER.4 | length 17.4
  Top Layer w0.25: H14.1@80.01,125.095 84.963,125.095 88.773,121.285 95.57,121.285 SERVER.4@95.771,121.084
SERVER_GPIO39: H14.2 SERVER.5 | length 16.9
  Top Layer w0.25: H14.2@80.01,122.555 86.57,122.555 88.986,120.139 95.446,120.139 SERVER.5@95.771,119.814
SERVER_IO0_AUTO: D21.1 Q8.3 | length 4
  Top Layer w0.25: Q8.3@108.95,100.711 110.925,100.711 112.195,101.981 D21.1@112.395,101.981
SERVER_IO0_KEY: D20.1 H23.2 SW4.3 SW4.4 | length 14.4
  Top Layer w0.25: SW4.4@106.081,93.023 SW4.3@110.581,93.023 114.359,93.023 H23.2@115.316,93.98 115.316,98.302 115.566,98.552 D20.1@115.669,98.552
SERVER_RTS: IC3.11 Q7.2 R69.1 | length 87.2
  Top Layer w0.25: v1(101.6,100.838) 100.64,101.798 Q7.2@99.425,101.798 99.775,101.798 101.795,103.818 101.795,103.942 R69.1@102.12,104.267 ; IC3.11@160.687,70.663 160.712,70.688 161.157,70.688 162.941,72.472 v1(162.941,77.343)
  Bottom Layer w0.25: v1(101.6,100.838) 116.078,100.838 116.586,100.33 116.586,97.155 119.38,94.361 125.349,94.361 136.779,82.931 157.353,82.931 v1(162.941,77.343)
SERVER_RXD: IC3.7 R106.1 | length 53.7
  Top Layer w0.25: R106.1@120.142,85.471 120.142,82.677 133.223,69.596 v1(149.098,69.596) ; IC3.7@160.687,69.063 162.032,69.063 162.352,69.383 162.982,69.383 v1(163.068,69.469)
  Bottom Layer w0.25: v1(149.098,69.596) 149.161,69.532 163.005,69.532 v1(163.068,69.469)
SERVER_TXD: IC3.6 R105.1 | length 59.8
  Top Layer w0.25: R105.1@121.793,85.471 121.793,82.677 133.985,70.485 150.884,70.485 151.03,70.339 151.03,70.131 v1(149.098,68.199) ; IC3.6@160.687,68.663 163.278,68.663 v1(164.084,69.469)
  Bottom Layer w0.25: v1(149.098,68.199) 163.703,68.199 164.084,68.58 v1(164.084,69.469)
SERVER_U0RXD: R105.2 SERVER.34 | length 42.5
  Top Layer w0.25: SERVER.34@113.271,119.814 113.596,120.139 114.297,120.139 114.554,120.396 118.999,120.396 119.507,120.904 v1(120.269,120.904) ; v1(120.142,96.52) 121.793,94.869 R105.2@121.793,86.571
  Bottom Layer w0.25: v1(120.142,96.52) 120.206,96.584 120.206,120.84 v1(120.269,120.904)
SERVER_U0TXD: R106.2 SERVER.35 | length 40.6
  Top Layer w0.25: SERVER.35@113.271,121.084 113.472,121.285 v1(118.237,121.285) ; v1(118.491,96.266) 120.142,94.615 R106.2@120.142,86.571
  Bottom Layer w0.25: v1(118.237,121.285) 118.237,121.163 118.491,120.909 v1(118.491,96.266)
USB_N: D9.2 IC3.58 USB-C.A7 USB-C.B7 | length 72.2
  Top Layer w0.102: v2(139.243,7.817) 139.192,7.766 139.192,7.612 139.408,7.396 USB-C.B7@139.408,7.131 ; v3(140.048,10.922) 140.048,10.925 140.36,11.236 140.36,18.015 140.301,18.075 139.391,18.075 139.192,18.274 D9.2@139.192,18.574 139.192,18.874 139.391,19.073 140.301,19.073 140.36,19.133 140.36,20.281 140.328,20.313 140.328,21.403 140.016,21.714 v1(140.016,21.717) 140.016,22.625 140.759,23.368 143.002,23.368 143.637,24.003 143.637,35.941 149.987,42.291 149.987,59.487 155.937,65.437 IC3.58@155.937,65.913 ; USB-C.A7@140.158,8.416 USB-C.A7@140.158,8.731 140.158,9.046 140.737,9.625 140.737,10.022 v1(140.843,10.127)
  Bottom Layer w0.102: v2(139.243,7.817) 139.954,8.528 139.954,9.238 v1(140.843,10.127) v3(140.048,10.922) ; v1(140.016,21.717) v1@140.101,21.632
USB_P: D8.2 IC3.59 USB-C.A6 USB-C.B6 | length 70.8
  Top Layer w0.102: USB-C.A6@139.658,8.731 139.658,9.707 140.096,10.145 ; USB-C.B6@139.908,7.131 139.908,8.2 139.871,8.238 139.871,9.569 140.081,9.779 140.081,10.13 140.096,10.145 ; IC3.59@156.337,65.913 156.337,65.437 150.19,59.29 150.19,42.207 143.84,35.857 143.84,23.919 143.086,23.165 140.843,23.165 v1(140.843,21.717) 140.843,21.714 140.531,21.403 140.531,20.397 140.564,20.365 140.564,19.133 140.623,19.073 141.533,19.073 141.732,18.874 D8.2@141.732,18.574 141.732,18.274 141.533,18.075 140.623,18.075 140.564,18.015 140.564,11.236 140.876,10.925 140.096,10.145
USB_VBUS: D6.1 R44.2 | length 3.5
  Top Layer w0.25: D6.1@152.4,48.8 R44.2@152.4,52.324
VREGOUT_NET: C38.1 IC3.8 IC3.25 IC3.31 IC3.44 IC3.66 | length 25.3
  Top Layer w0.25: IC3.31@154.737,73.813 154.737,73.173 ; IC3.25@157.137,73.813 157.137,72.936 156.718,72.517 155.393,72.517 154.737,73.173 ; C38.1@160.401,62.686 160.401,63.65 159.137,64.914 IC3.66@159.137,65.913 159.139,65.915 159.139,67.137 ; IC3.8@160.687,69.463 160.662,69.438 160.217,69.438 159.139,68.36 159.139,67.137 ; 154.737,73.173 154.737,72.533 154.335,72.132 154.335,70.566 153.257,69.488 152.812,69.488 IC3.44@152.787,69.463 152.812,69.438 153.257,69.438 154.178,68.517 154.178,67.456 154.324,67.31 158.966,67.31 159.139,67.137
pads on no net: "AP ESP32.17" "AP ESP32.18" "AP ESP32.19" "AP ESP32.20" "AP ESP32.21" "AP ESP32.22" "AP ESP32.32" CLIENT.17 CLIENT.18 CLIENT.19 CLIENT.20 CLIENT.21 CLIENT.22 CLIENT.32 H11.3 H15.3 IC3.5 IC3.12 IC3.14 IC3.15 IC3.16 IC3.20 IC3.22 IC3.23 IC3.24 IC3.32 IC3.33 IC3.37 IC3.40 IC3.41 IC3.42 IC3.43 IC3.45 IC3.46 IC3.47 IC3.48 IC3.49 IC3.50 IC3.52 IC3.53 IC3.54 IC3.55 IC3.56 IC3.62 IC3.63 IC3.64 IC3.65 IC3.67 IC3.69 SERVER.17 SERVER.18 SERVER.19 SERVER.20 SERVER.21 SERVER.22 SERVER.32 U6.15 U8.6 U8.9 U9.6 U9.7 U9.9 U9.15 U10.1 U10.2 U10.3 U10.4 U10.11 USB-C.A2 USB-C.A3 USB-C.A8 USB-C.A10 USB-C.A11 USB-C.B2 USB-C.B3 USB-C.B8 USB-C.B10 USB-C.B11 USB-C.H1 USB-C.H2

## Polygon pours and split planes (outlines as drawn)
+12.0 on Bottom Layer "NONET_L04_P003" (solid, shelved, pour order 3): 164.465,49.784 164.592,49.911 177.8,49.911 177.8,0.635 160.401,0.635 160.401,32.639 158.75,34.29 157.607,34.29 157.607,36.83 158.369,37.592 162.433,37.592 162.433,47.879 164.465,49.911
3V3 on 3V3 "NONET_L03_P002" (solid, shelved, pour order 2): 25.908,130.429 26.035,130.556 177.165,130.556 177.165,1.143 176.911,1.397 25.654,1.397
GND on GND "NONET_L02_P001" (solid, shelved, pour order 1): 26.035,130.175 26.289,130.429 177.038,130.429 177.038,1.27 25.781,1.27 25.781,8.128 26.035,12.827 26.035,17.018 26.035,130.302 25.908,130.429

## Other copper
Top Layer:
  drawing of 22 lines, arcs and shapes, not listed
  text "Server ESP32" at 115.316,126.492 h1.32
  text "Access Point ESP32" at 164.465,123.952 h1.32
  text "Client ESP32" at 45.339,102.616 h1.32
  text "Cyber-ICS-TestBed / 09-29-2026" at 27.051,72.898 h1.52
  text "Martin Korir" at 27.178,71.501 h0.72

## Silkscreen, mask and mechanical layers (free items; w line width, h text height)
Top Overlay:
  lines w0.254: 128.905,124.714 128.905,127
Mechanical 1:
  lines w0.254: 25.297,0.46 25.297,130.743 25.364,130.811 178.04,130.811 ; 25.4,0.381 178.009,0.381 178.041,0.35 178.041,130.811 ; 178.04,130.811 178.041,130.811

## Text inside footprints (layer, text, board x,y; h text height)
USB-C: Top 3D Body "Board Edge" at 138.683,0.731 h0.5